# Altium PCB CHIPBOY_Mk_II.PcbDoc
Units mil, origin at the board's own origin, x right, y up, seen from the top; angles counter-clockwise.
Board outline 3650 x 2500.29 mil, 2 copper layers (Top Layer, Bottom Layer); 40 components, 41 nets, 181 pads, 117 vias.
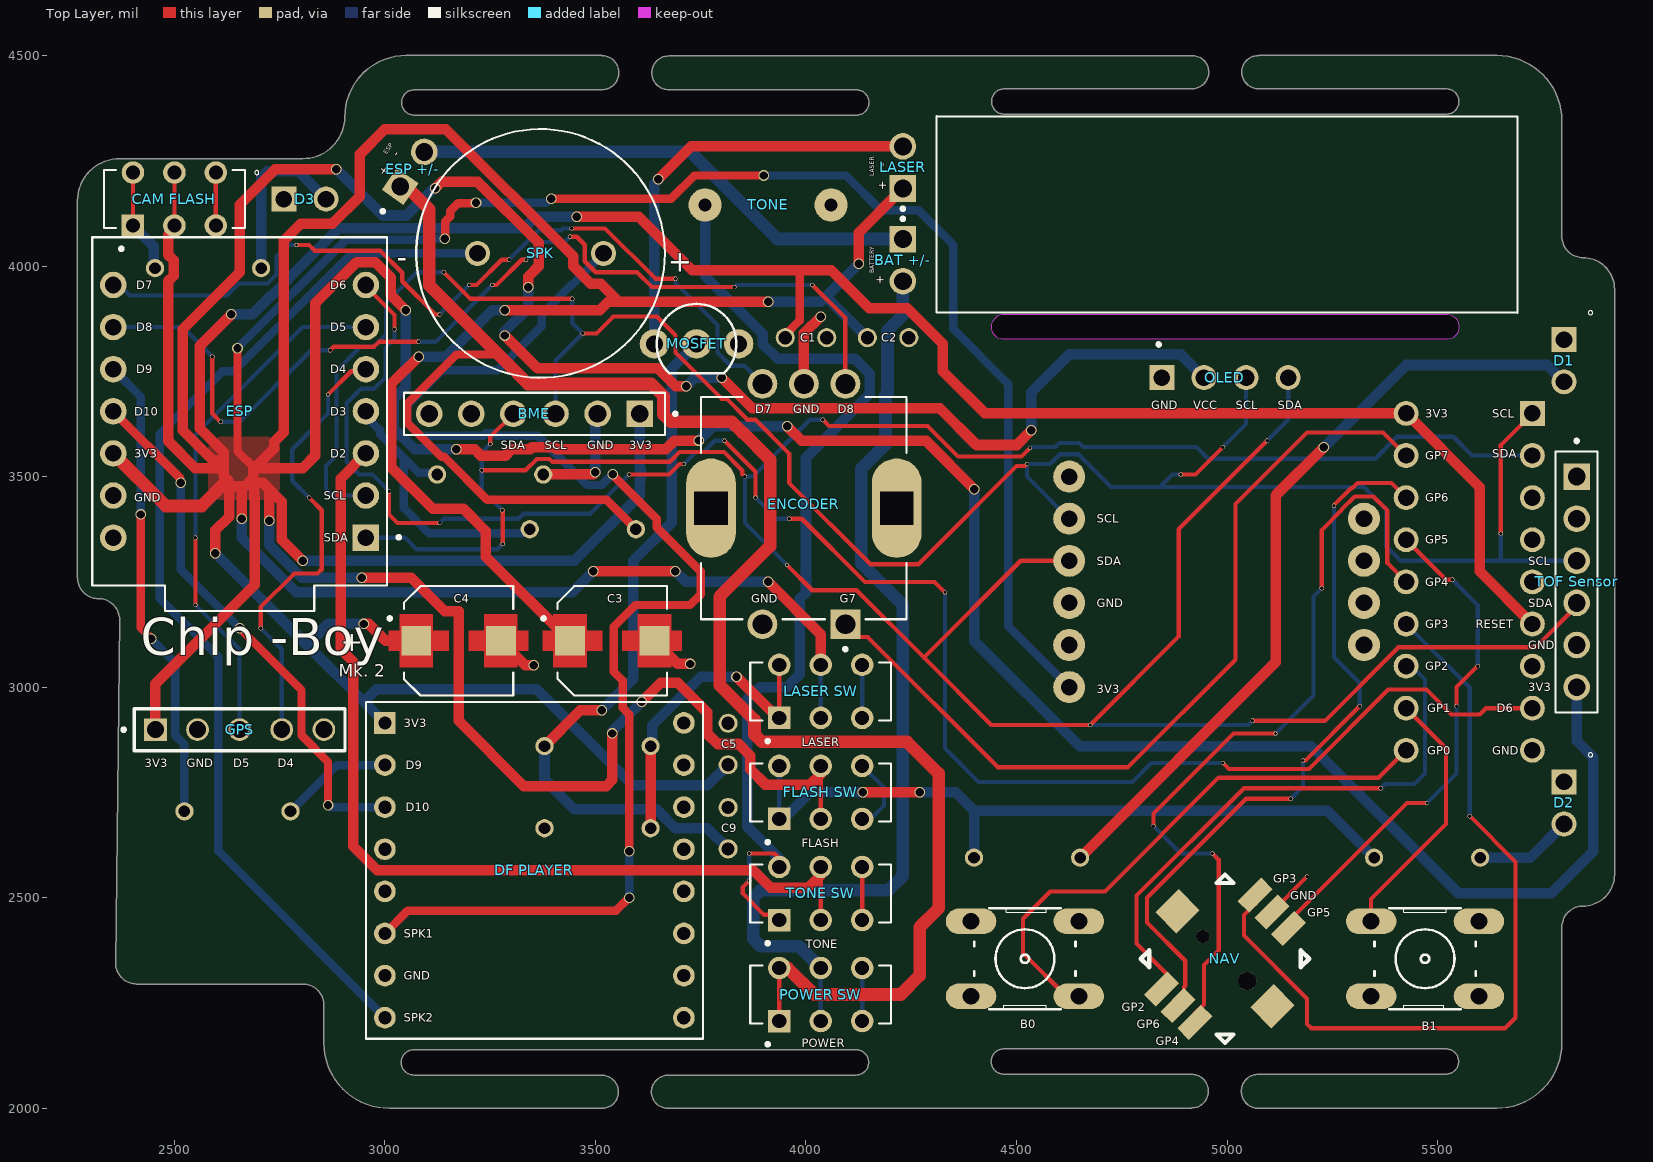
[diagram p0: Top Layer view]
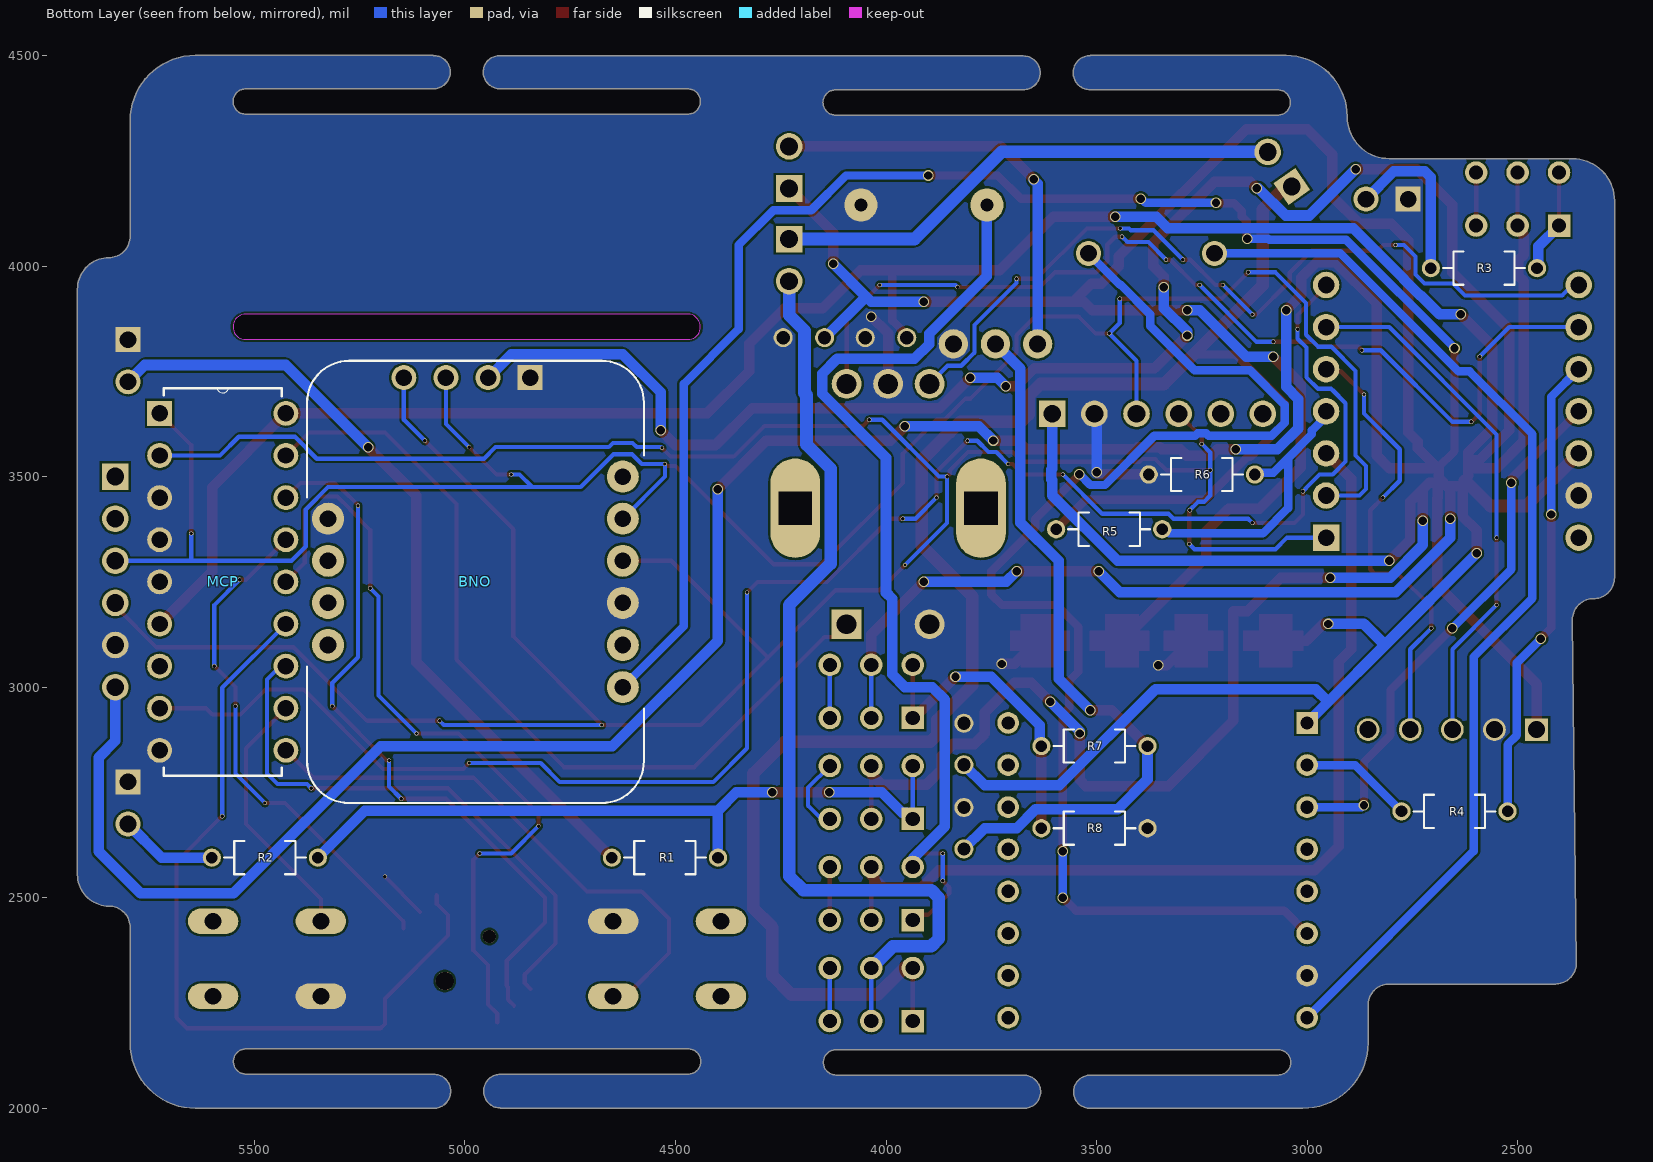
[diagram p1: Bottom Layer view, seen from below]
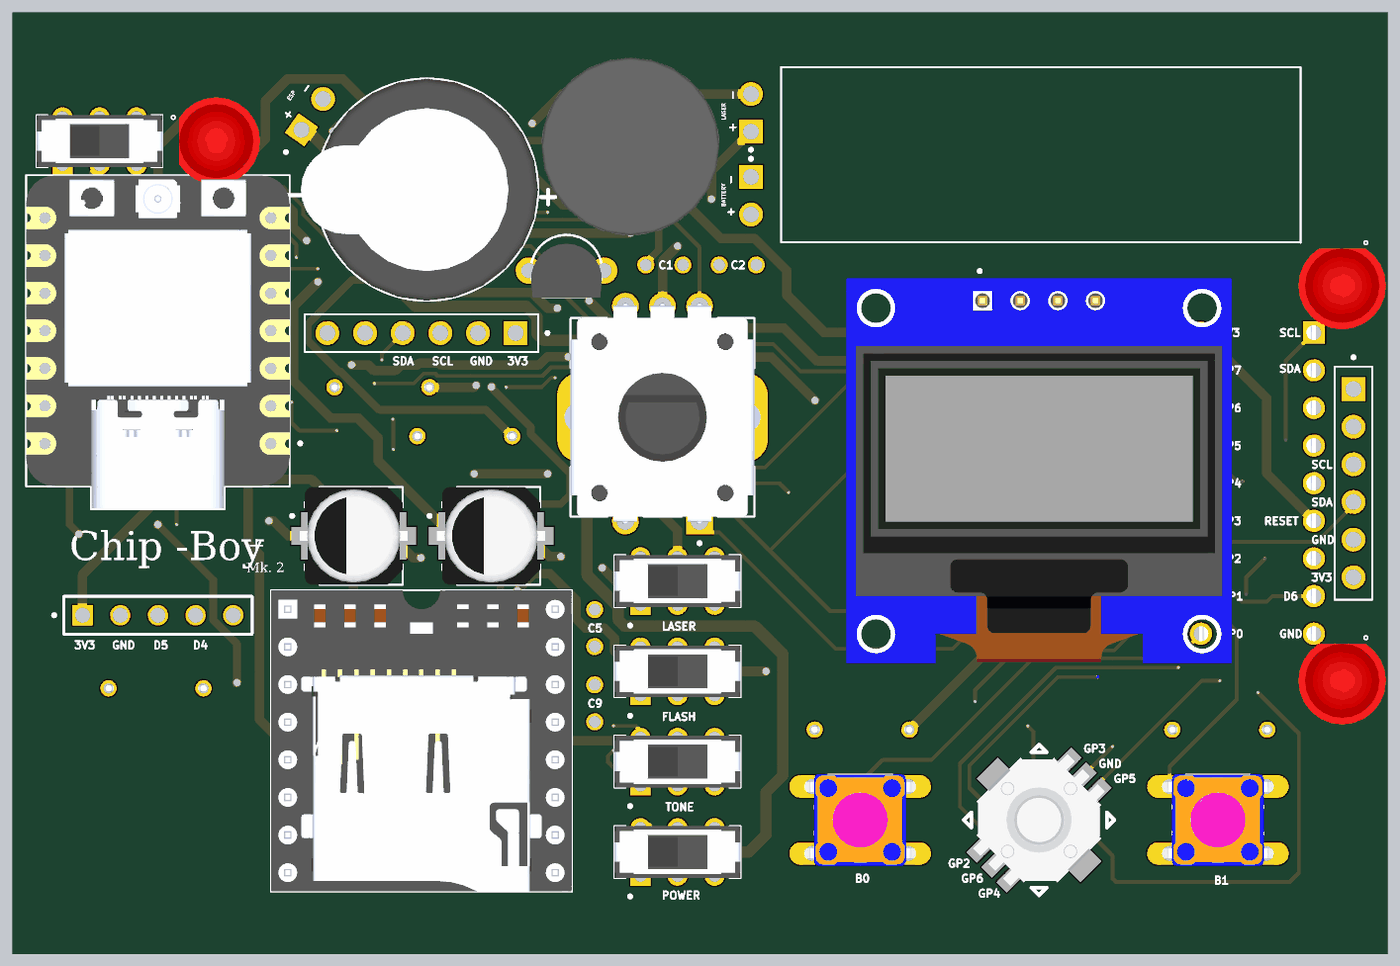
[diagram p2: 3D render of the assembled board from above, using the file's embedded part models]
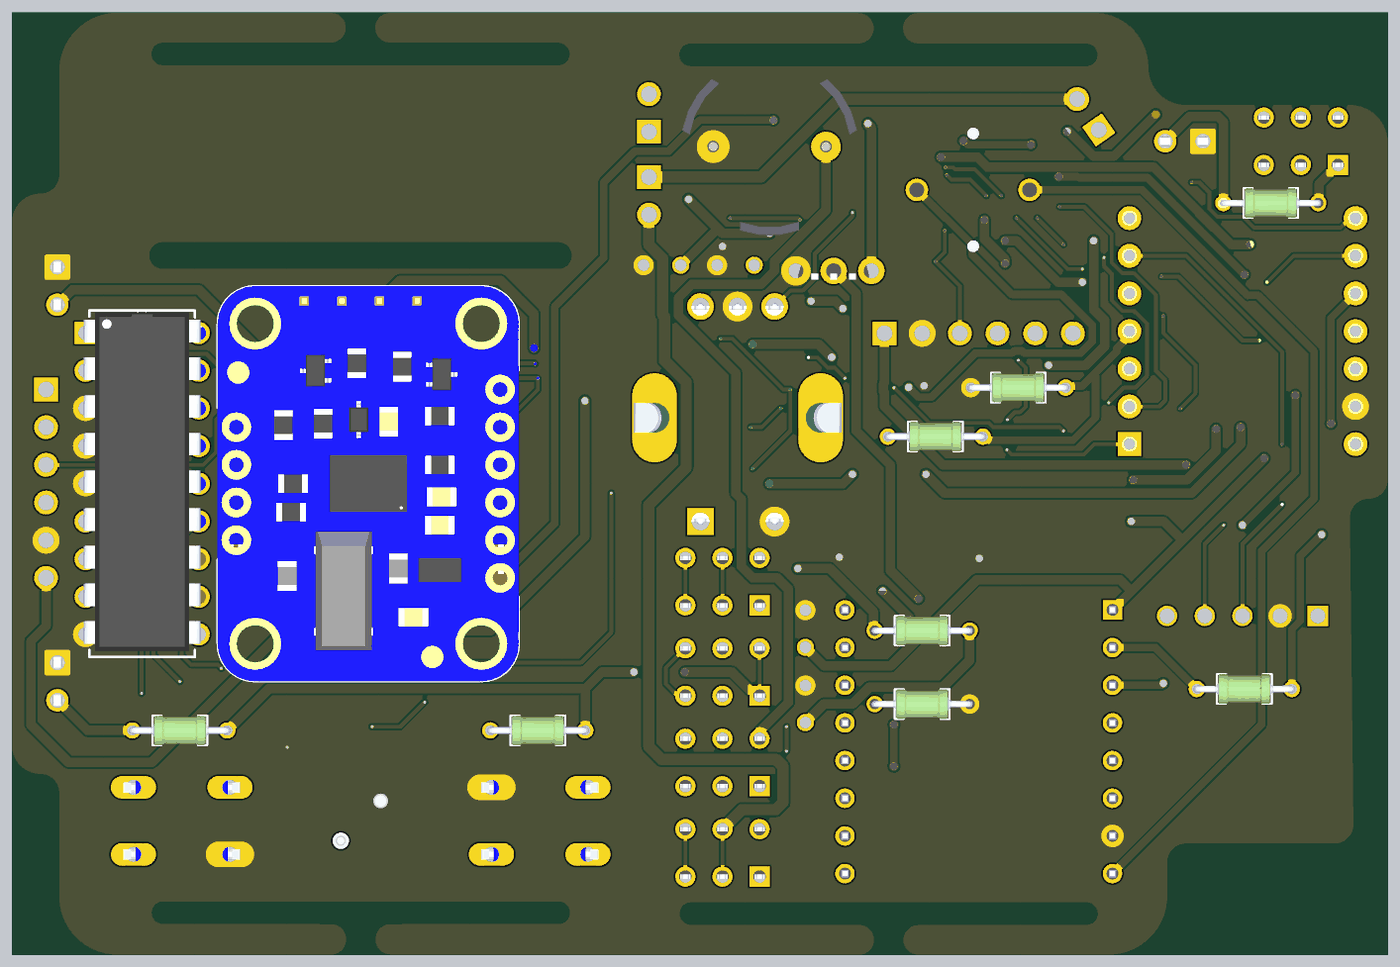
[diagram p3: 3D render of the assembled board from below, using the file's embedded part models]

## Layer stack, top to bottom
Top Solder: solder mask 0.4, Solder Resist, Dk 3.5
Top Layer: signal copper 1.4
Dielectric 1: dielectric 12.6, FR-4, Dk 4.8
Bottom Layer: signal copper 1.4
Bottom Solder: solder mask 0.4, Solder Resist, Dk 3.5

## Board outline
3010,2000 3515,2000 3514.71,1999.71 ccw(c3515.37,2039.06) 3554.71,2038.41 ccw(c3514.71,2038.41) 3514.71,2078.41 3068.81,2078.86 cw(c3068.79,2108.84) 3038.81,2108.81 cw(c3068.79,2108.79) 3068.81,2138.76 3069.02,2138.76 4119.02,2138.76 4118.81,2138.76 cw(c4118.84,2108.79) 4148.81,2108.81 cw(c4118.84,2108.84) 4118.81,2078.86 3672.91,2078.41 ccw(c3672.91,2038.41) 3632.91,2038.41 ccw(c3672.26,2039.06) 3672.91,1999.71 4915.62,1999.71 4915.62,2000.62 ccw(c4915.62,2040.62) 4955.62,2040.62 ccw(c4915.62,2040.62) 4915.62,2080.62 4469.71,2081.07 cw(c4469.69,2111.04) 4439.71,2111.02 cw(c4469.69,2110.99) 4469.71,2140.97 4469.92,2140.96 5519.92,2140.96 5519.71,2140.97 cw(c5519.74,2110.99) 5549.71,2111.02 cw(c5519.74,2111.04) 5519.71,2081.07 5073.81,2080.62 ccw(c5073.81,2040.62) 5033.81,2040.62 ccw(c5074.26,2040.16) 5073.81,1999.71 5075,2000 5640,2000 ccw(c5640,2155) 5795,2155 5795,2430 cw(c5845,2430) 5845,2480 ccw(c5845,2555) 5920,2555 5920,3945 ccw(c5845,3945) 5845,4020 cw(c5845,4070) 5795,4070 5795,4345 ccw(c5640,4345) 5640,4500 5075,4500 5074.71,4499.71 ccw(c5074.06,4460.37) 5034.71,4461.02 ccw(c5074.71,4461.02) 5074.71,4421.02 5520.62,4420.57 cw(c5520.64,4390.59) 5550.62,4390.62 cw(c5520.64,4390.64) 5520.62,4360.67 5520.41,4360.67 4470.41,4360.67 4470.62,4360.67 cw(c4470.59,4390.64) 4440.62,4390.62 cw(c4470.59,4390.59) 4470.62,4420.57 4916.52,4421.02 ccw(c4916.52,4461.02) 4956.52,4461.02 ccw(c4917.17,4460.37) 4916.52,4499.71 3673.81,4499.71 3673.81,4498.81 ccw(c3673.81,4458.81) 3633.81,4458.81 ccw(c3673.81,4458.81) 3673.81,4418.81 4119.71,4418.36 cw(c4119.74,4388.39) 4149.71,4388.41 cw(c4119.74,4388.44) 4119.71,4358.46 4119.51,4358.47 3069.51,4358.47 3069.71,4358.46 cw(c3069.69,4388.44) 3039.71,4388.41 cw(c3069.69,4388.39) 3069.71,4418.36 3515.62,4418.81 ccw(c3515.62,4458.81) 3555.62,4458.81 ccw(c3515.17,4459.26) 3515.62,4499.71 3515,4500 3050,4500 ccw(c3050,4355) 2905,4355 cw(c2805,4355) 2805,4255 2370,4255 ccw(c2370,4155) 2270,4155 2270,3260 ccw(c2320,3260) 2320,3210 cw(c2320,3160) 2370,3160 2360.63,2344.99 ccw(c2410.63,2344.99) 2410.63,2294.99 2410,2295 2805,2295 cw(c2805,2245) 2855,2245 2855,2155 ccw(c3010,2155)
cut-out: 4470.62,3825.67 cw(c4470.59,3855.64) 4440.62,3855.62 cw(c4470.59,3855.59) 4470.62,3885.57 4916.52,3886.02 5074.71,3886.02 5520.62,3885.57 cw(c5520.64,3855.59) 5550.62,3855.62 cw(c5520.64,3855.64) 5520.62,3825.67 5520.41,3825.67

## Design rules (kind name [scope] priority, off if disabled: settings)
Clearance Clearance_3 [All] p1: gap=0 ignorepadtopadclearanceinfootprint=FALSE
Clearance Clearance_1 [OnMid vs OnMid] p2: gap=10 ignorepadtopadclearanceinfootprint=FALSE sourcerule=38 cellrowname=All cellrowtype=0 cellcolname=All cellcoltype=0 innerlayers=TRUE
Clearance Clearance_2 [(ExistsOnLayer('Top Layer') Or ExistsOnLayer('Bottom Layer')) vs (ExistsOnLayer('Top Layer') Or ExistsOnLayer('Bottom Layer'))] p3: gap=10 ignorepadtopadclearanceinfootprint=FALSE sourcerule=38 cellrowname=All cellrowtype=0 cellcolname=All cellcoltype=0 outerlayers=TRUE
Clearance [All] p4: gap=10 ignorepadtopadclearanceinfootprint=FALSE ismatrix=TRUE
HoleToHoleClearance [All] p1: gap=5 allowstackedmicrovias=TRUE
MinimumSolderMaskSliver [All] p1: minsoldermaskwidth=5
PlaneConnect [All] p1: planeconnectstyle=Direct reliefexpansion=20 reliefentries=4 reliefconductorwidth=10 reliefairgap=10
PolygonConnect [All] p1: connectstyle=Direct reliefconductorwidth=10 reliefentries=4 polygonreliefangle="90 Angle" airgapwidth=10
RoutingVias [All] p1: holewidth=28 width=50 viastyle="Through Hole" minholewidth=28 minwidth=50 maxholewidth=28 maxwidth=50
ShortCircuit [All] p1: allowed=TRUE
SilkToSilkClearance [All] p1: silktosilkclearance=0
SilkToSolderMaskClearance [IsPad] p1: minsilkscreentomaskgap=0 clearancetoexposedcopper=TRUE
SolderMaskExpansion [All] p1: expansion=4 istentingtop=FALSE
Width MaxMinWidth_1 [All] p1: maxlimit=100 minlimit=10 preferedwidth=10 minimp=50.000000 maximp=50.000000 favimp=50.000000
Width [All] p2: maxlimit=10 minlimit=10 preferedwidth=10
24 further rules are at their usual default settings.

## Components (designator, comment, footprint, x,y, rotation, side; value= is the part's Value field where it differs from the comment)
B0 "SKHHANA010" SW_SKHHANA010 4520,2355 r180 top
B1 "SKHHANA010" SW_SKHHANA010 5470,2355 r0 top
"BAT +/-" "2_pin_header" HARWIN_M20-9990246 4230.08,4014.04 r270 top
BME "PPTC061LFBNRC" SULLINS_PPTC061LFBN-RC 3355.08,3649.04 r180 top
BNO "BNO055" MODULE_2472 4975,3250 r90 bottom
C1 "0_1uF100V_CAP_FA14X7R2A104KNU00" CAPRB250W50L450T300H550 4000,3830 r0 top
C2 "0_1uF100V_CAP_FA14X7R2A104KNU00" CAPRB250W50L450T300H550 4195,3830 r0 top
C3 "47uF_SMD" CAP_EEETPV470XAV 3540,3110 r0 top
C4 "47uF_SMD" CAP_EEETPV470XAV 3175,3110 r0 top
C5 "0_1uF100V_CAP_FA14X7R2A104KNU00" CAPRB250W50L450T300H550 3815,2865 r90 top
C9 "0_1uF100V_CAP_FA14X7R2A104KNU00" CAPRB250W50L450T300H550 3815,2665 r270 top
"CAM FLASH" "switch top actuated" SW_MHSS1104 2500.08,4159.04 r90 top
D1 "led_through_hole" LED_WP7113ID 5800,3775 r270 top
D2 "led_through_hole" LED_WP7113ID 5800,2725 r270 top
D3 "led_through_hole" LED_WP7113ID 2810.08,4159.04 r0 top
"DF PLAYER" "DFPLAYER" MODULE_DFR0299 3355,2565 r0 top
ENCODER "rotary encoder" XDCR_PEC12R-4217F-S0024 3995,3425 r180 top
ESP "xiao_esp32" MODULE_113991254 2655,3655 r180 top
"ESP +/-" "2_pin_header" HARWIN_M20-9990246 3065,4230 r55 top
"FLASH SW" "switch top actuated" SW_MHSS1104 4035,2750 r90 top
GPS "5 pin header" SAMTEC_MTSW-105-07-L-S-240-LL 2655.08,2899.04 r180 top
LASER "2_pin_header" HARWIN_M20-9990246 4230.08,4234.04 r90 top
"LASER SW" "switch top actuated" SW_MHSS1104 4035,2990 r90 top
MCP "gpio extender" DIP254P762X533-18 5425,2850 r180 bottom
MOSFET "mosfet" TO92 3740,3815 r0 top
NAV "nav switch" SW_JS1400BFQ 4995,2355 r45 top
OLED "DM-OLED096-636" MODULE_DM-OLED096-636 4995,3282.24 r0 top
"POWER SW" "switch top actuated" SW_MHSS1104 4035,2270 r90 top
R1 "resistor_through_hole" RESAD640W45L370D200 4525,2595 r0 bottom
R2 "resistor_through_hole" RESAD640W45L370D200 5475,2595 r0 bottom
R3 "resistor_through_hole" RESAD640W45L370D200 2580,3995 r0 bottom
R4 "resistor_through_hole" RESAD640W45L370D200 2650,2705 r180 bottom
R5 "resistor_through_hole" RESAD640W45L370D200 3470,3375 r0 bottom
R6 "resistor_through_hole" RESAD640W45L370D200 3250,3505 r180 bottom
R7 "resistor_through_hole" RESAD640W45L370D200 3505,2860 r0 bottom
R8 "resistor_through_hole" RESAD640W45L370D200 3505,2665 r180 bottom
SPK "15mm speaker" SPKR_CVS-1508 3369.61,4030 r180 top
"TOF Sensor" "PPTC061LFBNRC" SULLINS_PPTC061LFBN-RC 5830,3250 r270 top
TONE "Buzzer_3V" CUI_CMI-1295IC-0385T 3910,4145 r270 top
"TONE SW" "switch top actuated" SW_MHSS1104 4035,2510 r90 top

## Footprints (in the part's own frame and the unit in brackets; to place one, negate y for a bottom-side part, rotate by r counter-clockwise, add the part's x,y. Pads: shape width x height; smd on the part's side, far side on the other; paste and mask are expansions set on the pad)
CAP_EEETPV470XAV [mm]
  rect 1.8x1.8 smd paste-2 mask+0: 1(-2.55,0) 2(2.55,0)
  Top Layer region: 3.55,0.6 4.2,0.6 4.2,-0.6 3.55,-0.6 3.55,-1.6 1.55,-1.6 1.55,-0.6 0.6,-0.6 0.6,0.6 1.55,0.6 1.55,1.6 3.55,1.6
  Top Layer region: -1.55,0.6 -0.6,0.6 -0.6,-0.6 -1.55,-0.6 -1.55,-1.6 -3.55,-1.6 -3.55,-0.6 -4.2,-0.6 -4.2,0.6 -3.55,0.6 -3.55,1.6 -1.55,1.6
  silkscreen extent -4.25,-3.3 3.3,3.3, body extent -3.65,-3.3 3.65,3.3, height 8
CAPRB250W50L450T300H550 [mm]
  round 1.15 hole 0.8: 1(-1.25,0) 2(1.25,0)
CUI_CMI-1295IC-0385T [mm]
  round 2 hole 0.8: N(0,-3.8) P(0,3.8)
  body extent -6,-6 6,6, height 9
DIP254P762X533-18 [mil]
  rect 59x59 hole 39: 1(-300,800)
  round 59 hole 39: 2(-300,700) 3(-300,600) 4(-300,500) 5(-300,400) 6(-300,300) 7(-300,200) 8(-300,100) 9(-300,0) 10(0,0) 11(0,100) 12(0,200) 13(0,300) 14(0,400) 15(0,500) 16(0,600) 17(0,700) 18(0,800)
  silkscreen extent -290,-60 -10,860, body extent -305,-45 5,855, height 210
HARWIN_M20-9990246 [mm]
  rect 1.605x1.605 / inner round 1.605 / far side rect 1.605x1.605 hole 1.07: 1(-1.27,0)
  round 1.605 hole 1.07: 2(1.27,0)
  silkscreen extent -3.2,-0.1 -3,0.1
LED_WP7113ID [mm]
  round 1.508 hole 1: A(1.27,0)
  rect 1.508x1.508 / inner round 1.508 / far side rect 1.508x1.508 hole 1: C(-1.27,0)
  silkscreen extent -3.03,1.47 -2.77,1.73, body extent -2.5,-2.95 2.95,2.95, height 9.6
MODULE_2472 [mil]
  round 76 hole 39.37: 1(-250,-350) 2(-150,-350) 3(-50,-350) 4(50,-350) 5(150,-350) 6(250,-350) 7(150,350) 8(50,350) 9(-50,350) 10(-150,350)
  silkscreen extent -525,-400 525,400, body extent -525,-400 525,400, height 167
MODULE_113991254 [mm]
  rect 1.6x1.6 / inner round 1.6 / far side rect 1.6x1.6 hole 1: 1(-7.62,7.62)
  round 1.6 hole 1: 2(-7.62,5.08) 3(-7.62,2.54) 4(-7.62,0) 5(-7.62,-2.54) 6(-7.62,-5.08) 7(-7.62,-7.62) 8(7.62,-7.62) 9(7.62,-5.08) 10(7.62,-2.54) 11(7.62,0) 12(7.62,2.54) 13(7.62,5.08) 14(7.62,7.62)
  silkscreen extent -9.7,-10.5 8.89,12.04, body extent -8.89,-10.48 8.89,11.99, height 4.21
MODULE_DFR0299 [mil]
  rect 51.5x51.5 / inner round 51.5 / far side rect 51.5x51.5 hole 31.5: 1(-355,350)
  round 51.5 hole 31.5: 2(-355,250) 3(-355,150) 4(-355,50) 5(-355,-50) 6(-355,-150) 7(-355,-250) 8(-355,-350) 9(355,-350) 10(355,-250) 11(355,-150) 12(355,-50) 13(355,50) 14(355,150) 15(355,250) 16(355,350)
  silkscreen extent -400,-400 400,400, body extent -400,-400 400,400, height 246
MODULE_DM-OLED096-636 [mm]
  rect 1.508x1.508 / inner round 1.508 / far side rect 1.508x1.508 hole 1: 1(-3.81,11.5)
  round 1.508 hole 1: 2(-1.27,11.5) 3(1.27,11.5) 4(3.81,11.5)
  silkscreen extent -4.1,13.4 -3.9,13.6, body extent -13,-13 13,13, height 5.66
RESAD640W45L370D200 [mm]
  round 1.1 hole 0.7: 1(-3.2,0) 2(3.2,0)
  silkscreen extent -2.47,-1 2.47,1, body extent -3.42,-1 3.42,1, height 2
SAMTEC_MTSW-105-07-L-S-240-LL [mm]
  rect 1.37x1.37 / inner round 1.37 / far side rect 1.37x1.37 hole 1.02: 01(5.08,0)
  round 1.37 hole 1.02: 02(2.54,0) 03(0,0) 04(-2.54,0) 05(-5.08,0)
  silkscreen extent -6.35,-1.27 7.1,1.27
SPKR_CVS-1508 [mm]
  round 1.508 hole 1: M(3.8,0) P(-3.8,0)
  silkscreen extent -7.5,-7.5 7.5,7.5, body extent -7.5,-7.5 8.5,7.5, height 7.6
SULLINS_PPTC061LFBN-RC [mm]
  rect 1.605x1.605 / inner round 1.605 / far side rect 1.605x1.605 hole 1.07: 1(-6.35,0)
  round 1.605 hole 1.07: 2(-3.81,0) 3(-1.27,0) 4(1.27,0) 5(3.81,0) 6(6.35,0)
  silkscreen extent -8.6,-1.27 7.87,1.27
SW_JS1400BFQ [mm]
  rect 2x1 smd: 1(-4,1.425) 2(-4,0) 3(-4,-1.425) 4(4,1.425) 5(4,0) 6(4,-1.425)
  rect 2x1.8 smd: SH1(0,4.05) SH2(0,-4.05)
  round 0.8 hole 0.8 unplated: ""(0,1.9)
  round 1.1 hole 1.1 unplated: ""(0,-1.9)
  body extent -4.5,-3.9 4.5,3.9, height 4.99
SW_MHSS1104 [mm]
  rect 1.358x1.358 hole 0.85: 1(-1.6,2.5)
  round 1.358 hole 0.85: 2(1.6,2.5) 3(-1.6,0) 4(1.6,0) 5(-1.6,-2.5) 6(1.6,-2.5)
  silkscreen extent -3.1,-4.25 1.75,4.25, body extent -1.75,-4.25 1.75,4.25, height 5.5
SW_SKHHANA010 [mil]
  oval 120x60 hole 40: 1(-128,89) 2(128,89) 3(-128,-89) 4(128,-89)
  silkscreen extent -120,-120 120,120, body extent -156,-122 156,122, height 374
TO92 [mil]
  round 70 hole 40: 1(-100,0) 2(0,0) 3(100,0)
  silkscreen extent -95,-70 95,95, body extent -94,-71 94,71, height 210
XDCR_PEC12R-4217F-S0024 [mm]
  rect 1.8x1.8 / inner round 1.8 / far side rect 1.8x1.8 hole 1.2: 1(-2.5,7)
  round 1.8 hole 1.2: 2(2.5,7) A(-2.5,-7.5) B(2.5,-7.5) C(0,-7.5)
  oval 3x6 hole 2 square: SH1(-5.6,0) SH2(5.6,0)
  silkscreen extent -6.2,-6.7 6.2,8.6, body extent -7,-7.7 7,7.2, height 17.5

## Via types
v1: diameter 10, hole 8, Top Layer to Bottom Layer, tented both sides, 65 vias
v2: diameter 25, hole 20, Top Layer to Bottom Layer, tented both sides, 52 vias

## Nets (pads, with @x,y where several pads share a name; then routed paths per layer and width w, separated by ;. In a path a pad name is that pad's centre, name@x,y a point inside that pad or via, vN(x,y) a via of type N, cw(c..) or ccw(c..) an arc to the next point about the centre after c; other vN are vias at no path point)
GND: "DF PLAYER.7" "TOF Sensor.5" B0.3 B1.3 BME.2 BNO.3 BNO.7 C1.2 C2.2 C3.2 C4.2 C5.2 C9.1 D1.C D2.C D3.C ENCODER.2 ENCODER.C ESP.13 GPS.02 MCP.3 MCP.4 MCP.5 MCP.9 MOSFET.3 NAV.5 OLED.1 R6.1 R8.2 TONE.P | length 771.2
  Top Layer w10: NAV.5 v1(5190,2550)
  Top Layer w25: C4.2 3321.52,3063.88 3333.68,3051.71 v2(3353.29,3051.71) ; R6.1 3495,3505 v2(3500,3510) ; C3.2 3686.52,3063.88 3695.39,3055 v2(3725,3055) ; ENCODER.C 3995,3840 v2(4035,3880)
  Bottom Layer w25: v2(3500,3510) 3500,3643.95 BME.2
NetB0_1: B0.1 MCP.10 | length 1332.3
  Top Layer w10: B0.1 4618,2266 4515,2369 4515,2450 4580,2515 4710,2515 4980,2785 5360,2785 MCP.10
NetB1_1: B1.1 MCP.11 | length 619.1
  Top Layer w10: B1.1 5342,2497 5520,2675 5520,2855 MCP.11
"NetBAT +/-_1": "BAT +/-.1" "ESP +/-.2" | length 1229.2
  Bottom Layer w20: 3570,4265.96 3575,4270.96
  Bottom Layer w30: 3093.68,4270.96 3575,4270.96 3725.47,4270.96 3932.39,4064.04 4230.08,4064.04
"NetBAT +/-_2": "BAT +/-.2" "POWER SW.3" "POWER SW.4" | length 2283.3
  Bottom Layer w10: 4035,2207.01 4035,2332.99
  Bottom Layer w30: 4035,2332.99 3983.27,2384.72 3892.57,2384.72 3875,2402.3 3875,2500.26 3892.57,2517.83 4196.42,2517.83 4230.16,2551.56 4230.16,3194.84 4131.42,3293.58 4131.42,3518.87 4188.86,3576.31 4188.86,3693.86 4193.43,3698.43 4193.43,3846.58 4230.08,3883.24 4230.08,3964.04
NetBME_1: "CAM FLASH.3" "CAM FLASH.4" "DF PLAYER.1" "FLASH SW.3" "FLASH SW.4" "LASER SW.3" "LASER SW.4" "TOF Sensor.6" BME.1 BNO.1 C1.1 C2.1 C3.1 C4.1 C5.1 ESP.12 GPS.01 LASER.1 MCP.6 MCP.18 OLED.2 | length 30273.5
  Top Layer w10: 2500.08,4096.04 2500.08,4222.03 ; 4035,2687.01 4035,2792.99 4035,2812.99
  Top Layer w20: v2(2650,3805) 2650,3560 2690,3520 ; v2(3142.5,4065) 3143.46,4065.96 3143.46,4105.96 3155,4117.5 3155,4130 3174.04,4149.04 3215.4,4149.04 v2(3216.35,4150) ; v2(3395,4160) 3680,4160 3735,4215 v2(3900,4215) ; C1.1 3950.79,3836.02 3985,3870.23 3985,3990
  Top Layer w25: GPS.01 2455.08,3007.41 2691.16,3243.49 2691.16,3448.84 2690,3450 2690,3485 ; 2500.08,4096.04 2500.08,4088.34 2485,4073.26 2485,4026.46 2498.17,4013.29 2498.17,3976.71 2485,3963.54 2485,3585 2550,3520 2617.5,3520 ; v2(2597.5,3317.5) 2597.5,3372.5 2630,3405 2630,3477.5 ; 2617.5,3501.54 2617.5,3520 ; v2(2635,3885) 2560,3810 2560,3615 2617.5,3557.5 2617.5,3538.75 ; 2641.54,3477.5 2660,3477.5 ; v2(2660,3400) 2660,3477.5 ; v2(2725,3395) 2725,3470 ; v2(2805,3300) 2755,3350 2755,3440 2725,3470 ; v2(2885,4230) 2739.86,4230 2655,4145.14 2655,3985 2520,3850 2520,3610 2591.25,3538.75 2617.5,3538.75 ; v2(2945,3260) 3062.5,3260 3142.5,3180 3175,3180 3175,2920 3330,2765 3525.36,2765 3540,2779.64 v2(3540,2890) ; v2(2950,3150) 2961.45,3150 3000.33,3111.12 ; 3001.67,3110 C4.1 ; v2(3050,3895) 3013.68,3931.32 3013.68,3972.68 2977.37,4009 2932.63,4009 2835,3911.36 2835,3550 2805,3520 2690,3520 ; v2(3080,3785) 3015,3720 3015,3521.57 3113.22,3423.36 3186.64,3423.36 3240,3370 3240,3309.61 C3.1 ; v2(3120,4185) 3135,4200 3220,4200 3365,4055 3365,4000 3340,3975 v2(3340,3950) ; v2(3169.44,3564.44) 3213.26,3564.44 3227.7,3550 3286.44,3550 3300.89,3564.44 3344.7,3564.44 3349.41,3569.15 3402.56,3569.15 3407.27,3564.44 3666.94,3564.44 3688.11,3585.61 v2(3745,3585.61) ; v2(3285,3835) 3362.5,3757.5 3648.2,3757.5 3690.7,3715 v2(3715.69,3715) ; v2(3285,3895) 3510,3895 3530,3915 3555,3915 ; v2(3455.25,4116.95) 3603.05,4116.95 3730,3990 3985,3990 4060,3990 4150,3900 4240,3900 4325,3815 4325,3750 4425,3650 MCP.18 5600,3475 5600,3275 MCP.6 ; v2(3495,3275) v2(3690,3275) ; v2(3610,2965) 3655,3010 3695,3010 3765,2940 3765,2890 3790,2865 3840,2865 3867.71,2837.29 3867.71,2804.84 3903.79,2768.76 4010.77,2768.76 4035,2792.99 ; v2(3800,3734.92) 3872.58,3662.34 4019,3662.34 4019.15,3662.5 4065.67,3662.5 4065.83,3662.34 4317.66,3662.34 4405,3575 4500,3575 v2(4535,3610) ; v2(3910,3250) 4035,3125 4035,3052.99 ; v2(3910,3915) 3555,3915 ; v2(3955,3620) 3990,3585 4285,3585 v2(4400,3470) ; v2(4125,4005) 4125,4078.95 LASER.1 ; 2617.5,3520 2617.5,3538.75 ; 2660,3477.5 2668.46,3477.5 2682.98,3492.02 ; 2682.98,3492.02 2690,3485 ; 2682.98,3492.02 2687.5,3496.54 2687.5,3517.5 2690,3520 ; 2690,3485 2710,3485 2725,3470 ; 2690,3520 2737.5,3567.5 2737.5,3582.5 2760,3605 2760,4060 2800,4100 2874.85,4100 2940.85,4166 2940.85,4265.85 3000.05,4325.05 3144.95,4325.05 3447.03,4022.97 3447.03,4000.1 3489.31,3957.81 3512.19,3957.81 3555,3915
  Top Layer w30: ESP.12 2480,3430 2565,3430 2625.25,3490.25
  Bottom Layer w10: 4035,2927.01 4035,3052.99
  Bottom Layer w20: v2(2650,3805) 2907.5,4062.5 3090,4062.5 3092.5,4065 v2(3142.5,4065) ; v2(3216.35,4150) 3383.65,4150 3393.65,4160 v2(3395,4160) ; v2(3900,4215) 4095,4215 4177.56,4132.44 4267.56,4132.44 4350,4050 4350,3850 4480,3720 4480,3145 BNO.1
  Bottom Layer w25: v2(2597.5,3317.5) 2815,3100 ; v2(2635,3885) 2685,3885 2730.85,3930.85 2732.56,3930.85 2770.14,3968.43 2770.14,3970.14 2890,4090 3331.11,4090 3358.05,4116.95 v2(3455.25,4116.95) ; v2(2660,3400) 2660,3355 2790,3225 3445,3225 v2(3495,3275) ; v2(2725,3395) 2725,3337.57 2802.57,3260 v2(2945,3260) ; v2(2805,3300) 3450,3300 3605.08,3455.08 3605.08,3491.19 3607.5,3493.61 3607.5,3516.39 3605.08,3518.81 BME.1 ; v2(2885,4230) 2995,4120 3050.86,4120 3115.86,4185 v2(3120,4185) ; v2(2950,3150) 2865,3150 2815,3100 ; 3000,2915 2950,2965 ; v2(3050,3895) 3050,3712.88 3020.99,3683.87 3020.99,3614.2 3070.75,3564.44 v2(3169.44,3564.44) ; v2(3080,3785) 3145,3785 3255,3895 v2(3285,3895) ; v2(3285,3835) 3285,3845 3340,3900 v2(3340,3950) ; v2(3540,2890) 3540,2895 v2(3610,2965) ; v2(3690,3275) 3715,3250 v2@3905,3250 ; v2(3715.69,3715) 3735.62,3734.92 v2(3800,3734.92) ; v2(3745,3585.61) 3779.39,3620 v2(3955,3620) ; C5.1 3765.96,2766.75 3588.25,2766.75 3360,2995 2980,2995 2950,2965 ; v2(3910,3915) 4035,3915 4047.5,3927.5 ; v2(4125,4005) 4047.5,3927.5 ; C2.1 4145,3830 4047.5,3927.5 ; v2(4400,3470) 4400,3109.64 4649.64,2860 5200,2860 5550,2510 5770,2510 5870,2610 5870,2832.33 5830,2872.33 5830,3000 ; v2(4535,3610) 4535,3700 4625,3790 4890,3790 OLED.2 ; 2815,3100 2950,2965
NetBME_3: "TOF Sensor.3" BME.3 BNO.5 ESP.2 MCP.1 OLED.3 | length 5309.3
  Top Layer w10: v1(3140,3985) 3202.5,3922.5 v1(3445,3922.5) ; v1(3470,3840) 3502.5,3840 3542.5,3880 3645.71,3880 3690,3835.71 3690,3794.29 3799.29,3685 3811.03,3685 3861.19,3634.84 3880.16,3634.84 3960,3555 3960,3485 4153.11,3291.89 4266.89,3291.89 4500,3525 4520,3525 v1(4525,3530) ; v1(4890,3505) 4925,3505 v1(4990,3570) ; v1(5650,3365) 5650,3575 MCP.1
  Bottom Layer w10: ESP.2 2875.86,3455 2860,3470.86 2860,3525 2885,3550 2885,3750.76 2942.75,3808.5 2974.26,3808.5 3002.5,3836.74 3002.5,3912.5 3075,3985 v1(3140,3985) ; BME.3 3405.08,3775.08 v1(3470,3840) 3445,3865 v1(3445,3922.5) ; BNO.5 4525,3500 v1(4525,3530) 4580.05,3530 4603.05,3553 4646.95,3553 4724.95,3475 4840,3475 ; v1(4890,3505) 4870,3505 4840,3475 ; v1(4990,3570) 5045,3625 OLED.3 ; v1(5650,3365) 5650,3300 ; 5830,3300 5650,3300 ; 4840,3475 5324.95,3475 5378,3421.95 5378,3334.07 5412.07,3300 5650,3300
NetBME_4: "TOF Sensor.4" BME.4 BNO.4 ESP.1 MCP.2 OLED.4 | length 7287.5
  Top Layer w10: v1(3230,3515) 3334.15,3515 3360.8,3541.65 3391.17,3541.65 3397.82,3535 3676.39,3535 3699.5,3558.11 3805.2,3558.11 3848.58,3514.73 3848.58,3506.42 v1(3855,3500) ; v1(3250,3577.5) 3250,3593.95 BME.4 ; v1(3278.92,3420) 3280,3418.92 v1(3280,3340) ; v1(3955,3290) 4015,3230 4120,3230 4280,3070 ; v1(4040,3635) 4055,3620 4288.89,3620 4361.39,3547.5 4511.39,3547.5 v1(4531.95,3568.05) ; BNO.4 4510,3300 4280,3070 ; v1(5060,2920) 5232.07,2920 5406.57,3094.5 5732.43,3094.5 5830,3192.07 5830,3200 ; v1(5095,3585) 4885,3375 4885,3120 v1(4675,2910) 4440,2910 4280,3070
  Bottom Layer w10: ESP.1 3047.5,3355 3075,3327.5 3267.5,3327.5 v1(3280,3340) ; v1(3250,3577.5) 3230,3557.5 v1(3230,3515) 3230,3455 3245,3440 3258.92,3440 v1(3278.92,3420) ; v1(3955,3290) 3855,3390 v1(3855,3500) 3873.89,3500 4008.89,3635 v1(4040,3635) ; v1(4531.95,3568.05) 4533.89,3570 4591.76,3570 4601.76,3580 4648.24,3580 4658.24,3570 4927.13,3570 4954.63,3542.5 5351.76,3542.5 5403.76,3594.5 5536.9,3594.5 5581.4,3550 MCP.2 ; v1(4675,2910) 5050,2910 v1(5060,2920) ; v1(5095,3585) 5145,3635 OLED.4
NetC9_2: C9.2 MOSFET.2 R7.1 | length 1717.8
  Top Layer w25: R7.1 3464.02,2945 v2(3515,2945)
  Bottom Layer w25: R7.1 3379.02,2780.98 3450,2710 3645,2710 3690,2665 3765.79,2665 C9.2 ; v2(3515,2945) 3590,3020 3590,3300 3680.69,3390.69 3680.69,3755.69 MOSFET.2
"NetCAM FLASH_1": "CAM FLASH.1" "CAM FLASH.2" R3.1 | length 248.7
  Top Layer w10: 2401.66,4096.04 2401.66,4222.03
  Bottom Layer w25: 2401.66,4096.04 2451.25,4046.46 2451.25,3997.77 R3.1
"NetCAM FLASH_5": "CAM FLASH.5" "CAM FLASH.6" | length 126
  Top Layer w10: 2598.51,4096.04 2598.51,4222.03
NetD1_A: D1.A R1.2 | length 1882.2
  Top Layer w25: R1.2 5115,3059.02 5115,3455 v2(5230,3570)
  Bottom Layer w25: v2(5230,3570) 5425,3765 5760,3765 D1.A
NetD2_A: D2.A R2.2 | length 232.2
  Bottom Layer w25: R2.2 5720,2595 D2.A
NetD3_A: D3.A R3.2 | length 402.8
  Bottom Layer w25: R3.2 2705.98,4210.36 2720.63,4225 2794.12,4225 D3.A
"NetDF PLAYER_2": "DF PLAYER.2" R4.1 | length 269.6
  Bottom Layer w20: R4.1 2885.98,2815 3000,2815
"NetDF PLAYER_3": "DF PLAYER.3" ESP.11 | length 1283.3
  Top Layer w20: ESP.11 2514.04,3495.96 2514.04,3485.96 v2(2515,3485) ; v2(2655,3140) 2802.05,2992.95 2802.05,2885.64 2865,2822.7 v2(2865,2720)
  Bottom Layer w20: v2(2515,3485) 2515,3280 v2(2655,3140) ; v2(2865,2720) 2870,2715 3000,2715
"NetDF PLAYER_6": "DF PLAYER.6" SPK.P | length 3118.7
  Top Layer w20: 3000,2415 3054.25,2469.25 3549.25,2469.25 v2@3577.5,2497.5 ; v2(3540.91,3505.91) 3540.91,3504.56 3543.41,3502.06 3543.41,3501.59 3645.48,3399.52 3645.48,3379.52 3750,3275 3750,3220 3725,3195 3594.75,3195 3543.62,3143.87 3543.62,3036.38 3565,3015 3565,2950.38 3580,2935.38 v2(3580,2610)
  Bottom Layer w20: SPK.P 3444.36,3955.15 3442.29,3955.15 3372.5,3885.36 3372.5,3857.5 3267.5,3752.5 3135.58,3752.5 3053.49,3670.41 3053.49,3627.67 3084.21,3596.94 3234.09,3596.94 3239.64,3602.5 3260.36,3602.5 3265.91,3596.94 3363.06,3596.94 3480,3480 3515,3480 v2(3540.91,3505.91) ; v2(3580,2500) 3580,2608.65 v2(3580,2610)
"NetDF PLAYER_8": "DF PLAYER.8" SPK.M | length 2540
  Bottom Layer w20: 2640,3750 2614.04,3750 2465,3600.96 2465,3211.09 2604.55,3071.53 2604.55,2610.45 3000,2215 ; 2640.48,3749.52 2920.96,4030 SPK.M
NetENCODER_1: ENCODER.1 MCP.17 | length 2041
  Top Layer w10: ENCODER.1 4123.86,3118.98 4146.46,3118.98 4455.44,2810 4765,2810 5020,3065 5020,3435 5190,3605 5370,3605 MCP.17
NetENCODER_A: ENCODER.A ESP.9 | length 2355.9
  Top Layer w10: v1(2590,3785) 2590,3650 v1(2610,3630) ; v1(2870,3800) 2878.5,3808.5 2974.26,3808.5 2985.76,3820 v1(3080,3820) ; v1(3255,3955) 3265,3955 3325,4015 v1(3335,4015) ; v1(3439.45,4069.45) 3455.55,4069.45 3474.53,4050.47 3474.53,4011.49 3500.7,3985.31 3598.81,3985.31 3634.12,3950 v1(3830,3950) ; v1(4015,3955) 4093.43,3876.57 ENCODER.A
  Bottom Layer w10: ESP.9 2520,3855 v1(2590,3785) ; v1(2610,3630) 2655,3630 2825,3800 v1(2870,3800) ; v1(3080,3820) 3120,3820 v1(3255,3955) ; v1(3335,4015) 3376.95,4056.95 3426.95,4056.95 v1(3439.45,4069.45) ; v1(3830,3950) 3835,3955 v1(4015,3955)
NetENCODER_B: ENCODER.B ESP.8 | length 1988.9
  Top Layer w10: v1(2790,4050) 2820,4050 2833.5,4036.5 2988.76,4036.5 3041.18,3984.07 3041.18,3963.82 3120,3885 v1(3130,3885) ; v1(3200,3955) 3217.5,3955 3277.5,4015 v1(3295,4015) ; v1(3443.6,4089.45) 3522.96,4089.45 3642.41,3970 v1(3690,3970)
  Bottom Layer w10: ESP.8 2369.34,3955 2394.34,3930 2625,3930 2653.35,3958.35 2721.17,3958.35 2742.64,3979.82 2742.64,4022.64 2770,4050 v1(2790,4050) ; v1(3130,3885) v1(3200,3955) ; v1(3295,4015) 3365,4085 3418.6,4085 3423.05,4089.45 v1(3443.6,4089.45) ; v1(3690,3970) 3690,3960 3790,3860 3790,3794.29 3821.18,3763.11 3853.74,3763.11 ENCODER.B
"NetESP +/-_1": "ESP +/-.1" "POWER SW.1" "POWER SW.2" R5.2 | length 4446
  Top Layer w10: 3936.57,2207.01 3936.57,2332.99
  Top Layer w20: 3265,3790 3170,3790 3053.49,3673.49 3053.49,3627.67 3134.5,3546.65 3141.27,3546.65 3242.92,3445 3525.98,3445 R5.2
  Top Layer w30: 3036.32,4189.04 3050.96,4189.04 3105,4135 3105,3955 3340,3720 3632.66,3720 3661.68,3690.99 3661.68,3647.57 3679.25,3630 3823.6,3630 3848.76,3604.84 3850.16,3604.84 3915,3540 3915,3335 3795,3215 3795,3005 3877.64,2922.36 3877.64,2887.57 3895.21,2870 4240,2870 4315,2795 4315,2474.78 4270,2429.78 4270,2315 4225,2270 4019.57,2270 3956.57,2332.99 3936.57,2332.99
NetESP_3: "TONE SW.3" "TONE SW.4" ESP.3 | length 2259.2
  Top Layer w10: 4035,2447.01 4035,2552.99 4035,2572.99
  Top Layer w25: ESP.3 2895,3495 2895,3090 2925,3060 2925,2621.77 2981.77,2565 3875,2565 3916.24,2523.76 4005.77,2523.76 4035,2552.99
NetESP_4: ESP.4 R5.1 R6.2 | length 688.1
  Bottom Layer w20: ESP.4 2955,3643.37 2988.49,3609.88 2988.49,3600.74 3049.13,3540.1 ; R6.2 3119.56,3509.46 3079.77,3509.46 3049.13,3540.1 ; R5.1 3337.71,3375 3327.71,3365 3105,3365 3045,3425 3045,3535.96 3049.13,3540.1
NetESP_5: ESP.5 GPS.04 | length 1088
  Top Layer w10: v1(2705,3140) 2705,3190 2785,3270 2840,3270 2850,3280 2850,3420 v1(2820,3450) ; v1(2865,3695) 2920,3750 2950,3750 ESP.5
  Bottom Layer w10: v1(2705,3140) 2755.08,3089.92 GPS.04 ; v1(2820,3450) 2780,3490 2780,3565 2865,3650 v1(2865,3695)
NetESP_6: ESP.6 GPS.03 | length 1255.1
  Top Layer w10: v1(2550,3195) v1(2550,3355)
  Bottom Layer w10: v1(2550,3195) 2655.08,3089.92 GPS.03 ; v1(2550,3355) 2550,3600 2805,3855 ESP.6
NetESP_7: ESP.7 MCP.8 | length 4225
  Top Layer w10: ESP.7 2955,3951.11 3022.5,3883.61 v1(3022.5,3850) ; v1(3010,3465) 3010,3410 3030,3390 v1(3130,3390) ; v1(3580,3505) 3674.67,3505 3699.67,3530 v1(3710,3530) ; v1(3806.6,3585) 3880,3511.6 v1(3880,3450) ; v1(3960,3400) 3990,3400 4140,3250 4305,3250 v1(4330,3225) ; v1(4990,2820) 5004.14,2805.86 5194.14,2805.86 5382.78,2994.5 5473.45,2994.5 5532.95,2935 5599.84,2935 5614.84,2950 MCP.8
  Bottom Layer w10: v1(3010,3465) 3001.5,3473.5 3001.5,3474.26 2970.76,3505 2939.24,3505 2908.5,3535.74 2908.5,3674.26 2939.24,3705 2940,3705 2943.5,3708.5 2974.26,3708.5 3001.5,3735.74 3001.5,3806.25 3022.5,3827.25 v1(3022.5,3850) ; v1(3130,3390) 3140,3400 3317.18,3400 3328.83,3411.65 3486.65,3411.65 v1(3580,3505) ; v1(3710,3530) 3738.11,3558.11 3756.39,3558.11 3783.28,3585 v1(3806.6,3585) ; v1(3880,3450) 3930,3400 v1(3960,3400) ; v1(4330,3225) 4330,2855 4410,2775 4775,2775 4820,2820 v1(4990,2820)
NetESP_10: ESP.10 R4.2 | length 1120
  Top Layer w20: v2(2420,3410) 2420,3141.35 2445,3116.35 v2(2445,3115)
  Bottom Layer w20: ESP.10 2420,3690 v2(2420,3410) ; v2(2445,3115) 2502.05,3057.95 2502.05,2885.64 2524.02,2863.68 R4.2
"NetFLASH SW_1": "FLASH SW.1" "FLASH SW.2" R1.1 R2.1 | length 1740.1
  Top Layer w25: v2(4135,2750) v2(4270,2750)
  Bottom Layer w10: 3936.57,2687.01 3936.57,2812.99
  Bottom Layer w25: 3936.57,2687.01 3950.81,2701.24 3961.24,2701.24 4010,2750 v2(4135,2750) ; v2(4270,2750) 4355.36,2750 4399.02,2706.34 ; R1.1 4399.02,2706.34 ; R2.1 5237.68,2706.34 4399.02,2706.34
"NetFLASH SW_5": "FLASH SW.5" "FLASH SW.6" | length 180.4
  Bottom Layer w10: 4133.43,2687.01 4153.43,2687.01 4185,2718.58 4185,2761.42 4133.43,2812.99
"NetLASER SW_1": "LASER SW.1" "LASER SW.2" R7.2 R8.1 | length 762.4
  Top Layer w10: 3936.57,2927.01 3936.57,3052.99
  Top Layer w25: R8.1 R7.2 ; v2(3835,3025) 3918.76,2941.24 3922.34,2941.24 3936.57,2927.01
  Bottom Layer w25: R7.2 3634.49,2863.5 3634.49,2909.49 3750,3025 v2(3835,3025)
"NetLASER SW_5": "LASER SW.5" "LASER SW.6" | length 126
  Bottom Layer w10: 4133.43,2927.01 4133.43,3052.99
NetLASER_2: LASER.2 MOSFET.1 | length 1008.1
  Top Layer w25: v2(3649.02,4205.98) 3727.08,4284.04 LASER.2
  Bottom Layer w25: MOSFET.1 3640,4195 3649.02,4204.02 v2(3649.02,4205.98)
NetMCP_12: MCP.12 NAV.1 | length 1344.2
  Top Layer w10: NAV.1 4857.89,2297.23 4857.89,2318 4785,2390.9 4785,2505 5040,2760 v1(5365,2760)
  Bottom Layer w10: v1(5365,2760) 5375,2770 5445,2770 5470,2795 5470,3018.26 5438.26,3050 MCP.12
NetMCP_13: MCP.13 NAV.4 | length 1931.4
  Top Layer w10: NAV.4 5066.69,2485.26 5040,2458.57 5040,2410 5190,2260 5190,2200 5200,2190 5660,2190 5685,2215 5685,2585 v1(5576.37,2693.63)
  Bottom Layer w10: MCP.13 5576.37,2998.63 v1(5576.37,2693.63)
NetMCP_14: MCP.14 NAV.3 | length 1916.5
  Top Layer w10: v1(4825,2670) 4825,2700 5015,2890 v1(5115,2890) ; NAV.3 4923.31,2224.74 4945,2246.43 4945,2340 4980,2375 4980,2590 v1(4965,2605) ; v1(5225,3235) 5225,3373.3 5272,3420.3 5272,3421.95 5303.05,3453 5346.95,3453 5380.5,3419.45 5380.5,3294.5 MCP.14
  Bottom Layer w10: v1(4825,2670) 4890,2605 v1(4965,2605) ; v1(5115,2890) 5205,2980 5205,3215 v1(5225,3235)
NetMCP_15: MCP.15 NAV.6 | length 1216.5
  Top Layer w10: NAV.6 5146.03,2443.85 5427.18,2725 v1(5475,2725) ; MCP.15 5520,3255 v1(5535,3255) ; v1(5545,2955) 5545,3000 v1(5595,3050)
  Bottom Layer w10: v1(5475,2725) 5545,2795 v1(5545,2955) ; v1(5535,3255) 5595,3195 v1(5595,3050)
NetMCP_16: MCP.16 NAV.2 | length 1740.7
  Top Layer w10: NAV.2 4897.56,2257.56 4897.56,2287.85 4900.73,2291.02 4900.73,2350.14 4810,2440.88 4810,2500 5045,2735 v1(5151.05,2735) ; v1(5180,2825.86) 5185.86,2825.86 v1(5315,2955) ; v1(5253.92,3430.51) 5253.92,3432.16 5294.76,3473 5298,3473 5310,3485 5390,3485 MCP.16
  Bottom Layer w10: v1(5151.05,2735) 5180,2763.95 v1(5180,2825.86) ; v1(5253.92,3430.51) 5253.92,3071.08 5315,3010 v1(5315,2955)
"NetPOWER SW_5": "POWER SW.5" "POWER SW.6" | length 126
  Bottom Layer w10: 4133.43,2207.01 4133.43,2332.99
"NetTONE SW_1": "TONE SW.1" "TONE SW.2" TONE.N | length 2350.7
  Top Layer w10: v1(3865,2540) 3850,2525 3850,2510 3900.7,2459.3 3924.28,2459.3 3936.57,2447.01 ; v1(3865,2605) 3924.57,2605 3956.57,2572.99
  Bottom Layer w10: v1(3865,2540) v1(3865,2605)
  Bottom Layer w25: TONE.N 3760.39,3975.92 3897.5,3838.82 3897.5,3814.45 3932.59,3779.36 4116.27,3779.36 4151.36,3744.27 4151.36,3696.28 4000,3544.92 4000,3224.64 3985.36,3210 3985.36,3030.36 3955,3000 3890,3000 3860,2970 3860,2669.57 3936.57,2592.99 3936.57,2572.99
"NetTONE SW_5": "TONE SW.5" "TONE SW.6" | length 126
  Top Layer w10: 4133.43,2447.01 4133.43,2572.99
pads on no net: "DF PLAYER.4" "DF PLAYER.5" "DF PLAYER.9" "DF PLAYER.10" "DF PLAYER.11" "DF PLAYER.12" "DF PLAYER.13" "DF PLAYER.14" "DF PLAYER.15" "DF PLAYER.16" "TOF Sensor.1" "TOF Sensor.2" B0.2 B0.4 B1.2 B1.4 BME.5 BME.6 BNO.2 BNO.6 BNO.8 BNO.9 BNO.10 ENCODER.SH1 ENCODER.SH2 ESP.14 GPS.05 MCP.7 NAV. NAV.SH1 NAV.SH2

## Polygon pours and split planes (outlines as drawn)
NetBME_1 on Top Layer "NONET_L-01_P-001" (solid, pour order 0): 2580,3570 2580,3470 2605,3445 2725,3445 2750,3470 2750,3570 2725,3595 2605,3595
GND on Bottom Layer "GND_L02_P016" (solid, pour order 16): 3010,2000 3515,2000 3514.71,1999.71 ccw(c3515.37,2039.06) 3554.71,2038.41 ccw(c3514.71,2038.41) 3514.71,2078.41 3068.81,2078.86 cw(c3068.79,2108.84) 3038.81,2108.81 cw(c3068.79,2108.79) 3068.81,2138.76 3069.02,2138.76 4119.02,2138.76 4118.81,2138.76 cw(c4118.84,2108.79) 4148.81,2108.81 cw(c4118.84,2108.84) 4118.81,2078.86 3672.91,2078.41 ccw(c3672.91,2038.41) 3632.91,2038.41 ccw(c3672.26,2039.06) 3672.91,1999.71 4915.62,1999.71 4915.62,2000.62 ccw(c4915.62,2040.62) 4955.62,2040.62 ccw(c4915.62,2040.62) 4915.62,2080.62 4469.71,2081.07 cw(c4469.69,2111.04) 4439.71,2111.02 cw(c4469.69,2110.99) 4469.71,2140.97 4469.92,2140.96 5519.92,2140.96 5519.71,2140.97 cw(c5519.74,2110.99) 5549.71,2111.02 cw(c5519.74,2111.04) 5519.71,2081.07 5073.81,2080.62 ccw(c5073.81,2040.62) 5033.81,2040.62 ccw(c5074.26,2040.16) 5073.81,1999.71 5075,2000 5640,2000 ccw(c5640,2155) 5795,2155 5795,2430 cw(c5845,2430) 5845,2480 ccw(c5845,2555) 5920,2555 5920,3945 ccw(c5845,3945) 5845,4020 cw(c5845,4070) 5795,4070 5795,4345 ccw(c5640,4345) 5640,4500 5075,4500 5074.71,4499.71 ccw(c5074.06,4460.37) 5034.71,4461.02 ccw(c5074.71,4461.02) 5074.71,4421.02 5520.62,4420.57 cw(c5520.64,4390.59) 5550.62,4390.62 cw(c5520.64,4390.64) 5520.62,4360.67 5520.41,4360.67 4470.41,4360.67 4470.62,4360.67 cw(c4470.59,4390.64) 4440.62,4390.62 cw(c4470.59,4390.59) 4470.62,4420.57 4916.52,4421.02 ccw(c4916.52,4461.02) 4956.52,4461.02 ccw(c4917.17,4460.37) 4916.52,4499.71 3673.81,4499.71 3673.81,4498.81 ccw(c3673.81,4458.81) 3633.81,4458.81 ccw(c3673.81,4458.81) 3673.81,4418.81 4119.71,4418.36 cw(c4119.74,4388.39) 4149.71,4388.41 cw(c4119.74,4388.44) 4119.71,4358.46 4119.51,4358.47 3069.51,4358.47 3069.71,4358.46 cw(c3069.69,4388.44) 3039.71,4388.41 cw(c3069.69,4388.39) 3069.71,4418.36 3515.62,4418.81 ccw(c3515.62,4458.81) 3555.62,4458.81 ccw(c3515.17,4459.26) 3515.62,4499.71 3515,4500 3050,4500 ccw(c3050,4355) 2905,4355 cw(c2805,4355) 2805,4255 2370,4255 ccw(c2370,4155) 2270,4155 2270,3260 ccw(c2320,3260) 2320,3210 cw(c2320,3160) 2370,3160 2360.63,2344.99 ccw(c2410.63,2344.99) 2410.63,2294.99 2410,2295 2805,2295 cw(c2805,2245) 2855,2245 2855,2155 ccw(c3010,2155)

## Silkscreen, mask and mechanical layers (free items; w line width, h text height)
Top Overlay:
  lines w5: 4310,4355 5690,4355 5690,3889 ; 4310,4356 4310,3890 5690,3890
  lines w10: 4795,2355 4815,2375 4815,2355 4815,2335 4795,2355 ; 4975,2175 4995,2155 5015,2175 4995,2175 4975,2175 ; 4975,2535 4995,2555 5015,2535 4995,2535 4975,2535 ; 5175,2335 5195,2355 5175,2375 5175,2355 5175,2335
  text "ESP" at 3004.26,4264.18 h10 r55
  text "LASER" at 4162,4213 h10 r90
  text "+    -" at 2998.77,4211.96 h20 r55
  text "+    -" at 4190,4180 h20 r90
  text "BATTERY" at 4162,3983 h10 r90
  text "+    -" at 4185,3955 h20 r90
  text "D7" at 2410,3945 h20
  text "D6" at 2870,3945 h20
  text "D8" at 2410,3845 h20
  text "D5" at 2870,3845 h20
  text "D9" at 2410,3745 h20
  text "D4" at 2870,3745 h20
  text "GND" at 4820,3660 h20
  text "VCC" at 4920,3660 h20
  text "SCL" at 5020,3660 h20
  text "SDA" at 5120,3660 h20
  text "D7" at 3880,3650 h20
  text "GND" at 3970,3650 h20
  text "D8" at 4075,3650 h20
  text "D10" at 2405,3645 h20
  text "D3" at 2870,3645 h20
  text "3V3" at 5470,3640 h20
  text "SCL" at 5630,3640 h20
  text "SDA" at 3275,3565 h20
  text "SCL" at 3380,3565 h20
  text "GND" at 3480,3565 h20
  text "3V3" at 3580,3565 h20
  text "3V3" at 2405,3545 h20
  text "D2" at 2870,3545 h20
  text "SDA" at 5630,3545 h20
  text "GP7" at 5470,3540 h20
  text "SCL" at 2855,3445 h20
  text "GND" at 2405,3440 h20
  text "GP6" at 5470,3440 h20
  text "SCL" at 4690,3390 h20
  text "SDA" at 2855,3345 h20
  text "GP5" at 5470,3340 h20
  text "SDA" at 4690,3290 h20
  text "SCL" at 5715,3290 h20
  text "GP4" at 5470,3240 h20
  text "GND" at 3870,3200 h20
  text "G7" at 4080,3200 h20
  text "GND" at 4690,3190 h20
  text "SDA" at 5715,3190 h20
  text "GP3" at 5470,3140 h20
  text "RESET" at 5590,3140 h20
  text "GND" at 5715,3090 h20
  text "+" at 2895,3069.2 h80
  text "Chip -Boy" at 2420,3046.12 h150
  text "GP2" at 5470,3040 h20
  text "Mk. 2" at 2890,3013.86 h50
  text "3V3" at 5715,2990 h20
  text "3V3" at 4690,2985 h20
  text "GP1" at 5475,2940 h20
  text "D6" at 5640,2940 h20
  text "3V3" at 3045,2905 h20
  text "LASER" at 3990,2860 h20
  text "GP0" at 5475,2840 h20
  text "GND" at 5630,2840 h20
  text "3V3" at 2430,2810 h20
  text "GND" at 2530,2810 h20
  text "D5" at 2640,2810 h20
  text "D4" at 2745,2810 h20
  text "D9" at 3050,2805 h20
  text "D10" at 3050,2705 h20
  text "FLASH" at 3990,2620 h20
  text "GP3" at 5110,2535 h20
  text "GND" at 5150,2495 h20
  text "GP5" at 5190,2455 h20
  text "SPK1" at 3045,2405 h20
  text "TONE" at 4000,2380 h20
  text "GND" at 3045,2305 h20
  text "GP2" at 4750,2230 h20
  text "SPK2" at 3045,2205 h20
  text "GP6" at 4785,2190 h20
  text "GP4" at 4830,2150 h20
  text "POWER" at 3990,2145 h20
Mechanical 1:
  circle w5: c3910.08,4144.04 r192.37
  lines w10: 2360.63,2344.99 2370,3160 ; 2370,4255 2805,4255 ; 2410,2295 2805,2295 ; 2855,2155 2855,2245 ; 3068.81,2138.76 ccw(c3068.79,2108.79) 3038.81,2108.81 ccw(c3068.79,2108.84) 3068.81,2078.86 3514.71,2078.41 cw(c3514.71,2038.41) 3554.71,2038.41 cw(c3515.37,2039.06) 3514.71,1999.71 ; 3069.02,2138.76 4119.02,2138.76 ; 3069.51,4358.47 4119.51,4358.47 ; 3069.71,4358.46 cw(c3069.69,4388.44) 3039.71,4388.41 cw(c3069.69,4388.39) 3069.71,4418.36 3515.62,4418.81 ccw(c3515.62,4458.81) 3555.62,4458.81 ccw(c3515.17,4459.26) 3515.62,4499.71 ; 3673.81,4498.81 ccw(c3673.81,4458.81) 3633.81,4458.81 ccw(c3673.81,4458.81) 3673.81,4418.81 4119.71,4418.36 cw(c4119.74,4388.39) 4149.71,4388.41 cw(c4119.74,4388.44) 4119.71,4358.46 ; 3673.81,4499.71 4294.71,4499.71 4916.52,4499.71 cw(c4917.17,4460.37) 4956.52,4461.02 cw(c4916.52,4461.02) 4916.52,4421.02 4470.62,4420.57 ccw(c4470.59,4390.59) 4440.62,4390.62 ccw(c4470.59,4390.64) 4470.62,4360.67 ; 4118.81,2138.76 cw(c4118.84,2108.79) 4148.81,2108.81 cw(c4118.84,2108.84) 4118.81,2078.86 3672.91,2078.41 ccw(c3672.91,2038.41) 3632.91,2038.41 ccw(c3672.26,2039.06) 3672.91,1999.71 4294.71,1999.71 4915.62,1999.71 ; 4469.71,2140.97 ccw(c4469.69,2110.99) 4439.71,2111.02 ccw(c4469.69,2111.04) 4469.71,2081.07 4915.62,2080.62 cw(c4915.62,2040.62) 4955.62,2040.62 cw(c4915.62,2040.62) 4915.62,2000.62 ; 4469.92,2140.96 5519.92,2140.96 ; 4470.41,3825.67 5520.41,3825.67 ; 4470.62,3825.67 cw(c4470.59,3855.64) 4440.62,3855.62 cw(c4470.59,3855.59) 4470.62,3885.57 4916.52,3886.02 5074.71,3886.02 5520.62,3885.57 cw(c5520.64,3855.59) 5550.62,3855.62 cw(c5520.64,3855.64) 5520.62,3825.67 ; 5073.81,1999.71 cw(c5074.26,2040.17) 5033.81,2040.62 cw(c5073.81,2040.62) 5073.81,2080.62 5519.71,2081.07 ccw(c5519.74,2111.04) 5549.71,2111.02 ccw(c5519.74,2110.99) 5519.71,2140.97 ; 5074.71,4499.71 ccw(c5074.06,4460.37) 5034.71,4461.02 ccw(c5074.71,4461.02) 5074.71,4421.02 5520.62,4420.57 cw(c5520.64,4390.59) 5550.62,4390.62 cw(c5520.64,4390.64) 5520.62,4360.67 ; 4470.41,4360.67 5520.41,4360.67 4470.41,4360.67
  lines w50: 3031.41,4183.08 3088.76,4264.99
Mechanical 13:
  lines w10: 2360.63,2344.99 ccw(c2410.63,2344.99) 2410.63,2294.99 ; 2370,3160 ccw(c2320,3160) 2320,3210 cw(c2320,3260) 2270,3260 2270,4155 cw(c2370,4155) 2370,4255 ; 2805,2295 cw(c2805,2245) 2855,2245 ; 2805,4255 ccw(c2805,4355) 2905,4355 cw(c3050,4355) 3050,4500 3515,4500 ; 2855,2155 ccw(c3010,2155) 3010,2000 3515,2000 ; 5075,2000 5640,2000 ccw(c5640,2155) 5795,2155 5795,2430 cw(c5845,2430) 5845,2480 ccw(c5845,2555) 5920,2555 5920,3945 ccw(c5845,3945) 5845,4020 cw(c5845,4070) 5795,4070 5795,4345 ccw(c5640,4345) 5640,4500 5075,4500

## Text inside footprints (layer, text, board x,y; h text height)
B0: Mechanical 13 "1" at 4690.13,2289.95 h50.04 r180; Mechanical 13 "2" at 4379.79,2294.91 h50.08 r180; Mechanical 13 "3" at 4700.16,2465.1 h50.04 r180; Mechanical 13 "4" at 4379.86,2465.11 h50.05 r180
B1: Mechanical 13 "1" at 5299.87,2420.05 h50.04; Mechanical 13 "2" at 5610.21,2415.09 h50.08; Mechanical 13 "3" at 5289.84,2244.9 h50.04; Mechanical 13 "4" at 5610.14,2244.89 h50.05
SPK: Top Overlay "-" at 3053.44,4035.01 h50.19 r180; Top Overlay "+" at 3729.35,4030 h50.18 r180